# Altium PCB GR_carte_action27v2.PcbDoc
Units mil, origin at the board's own origin, x right, y up, seen from the top; angles counter-clockwise.
Board outline 3465 x 2675 mil, 2 copper layers (Top Layer, Bottom Layer); 55 components, 45 nets, 211 pads, 1 vias.
Unrouted connection lines stored in the file: 1.
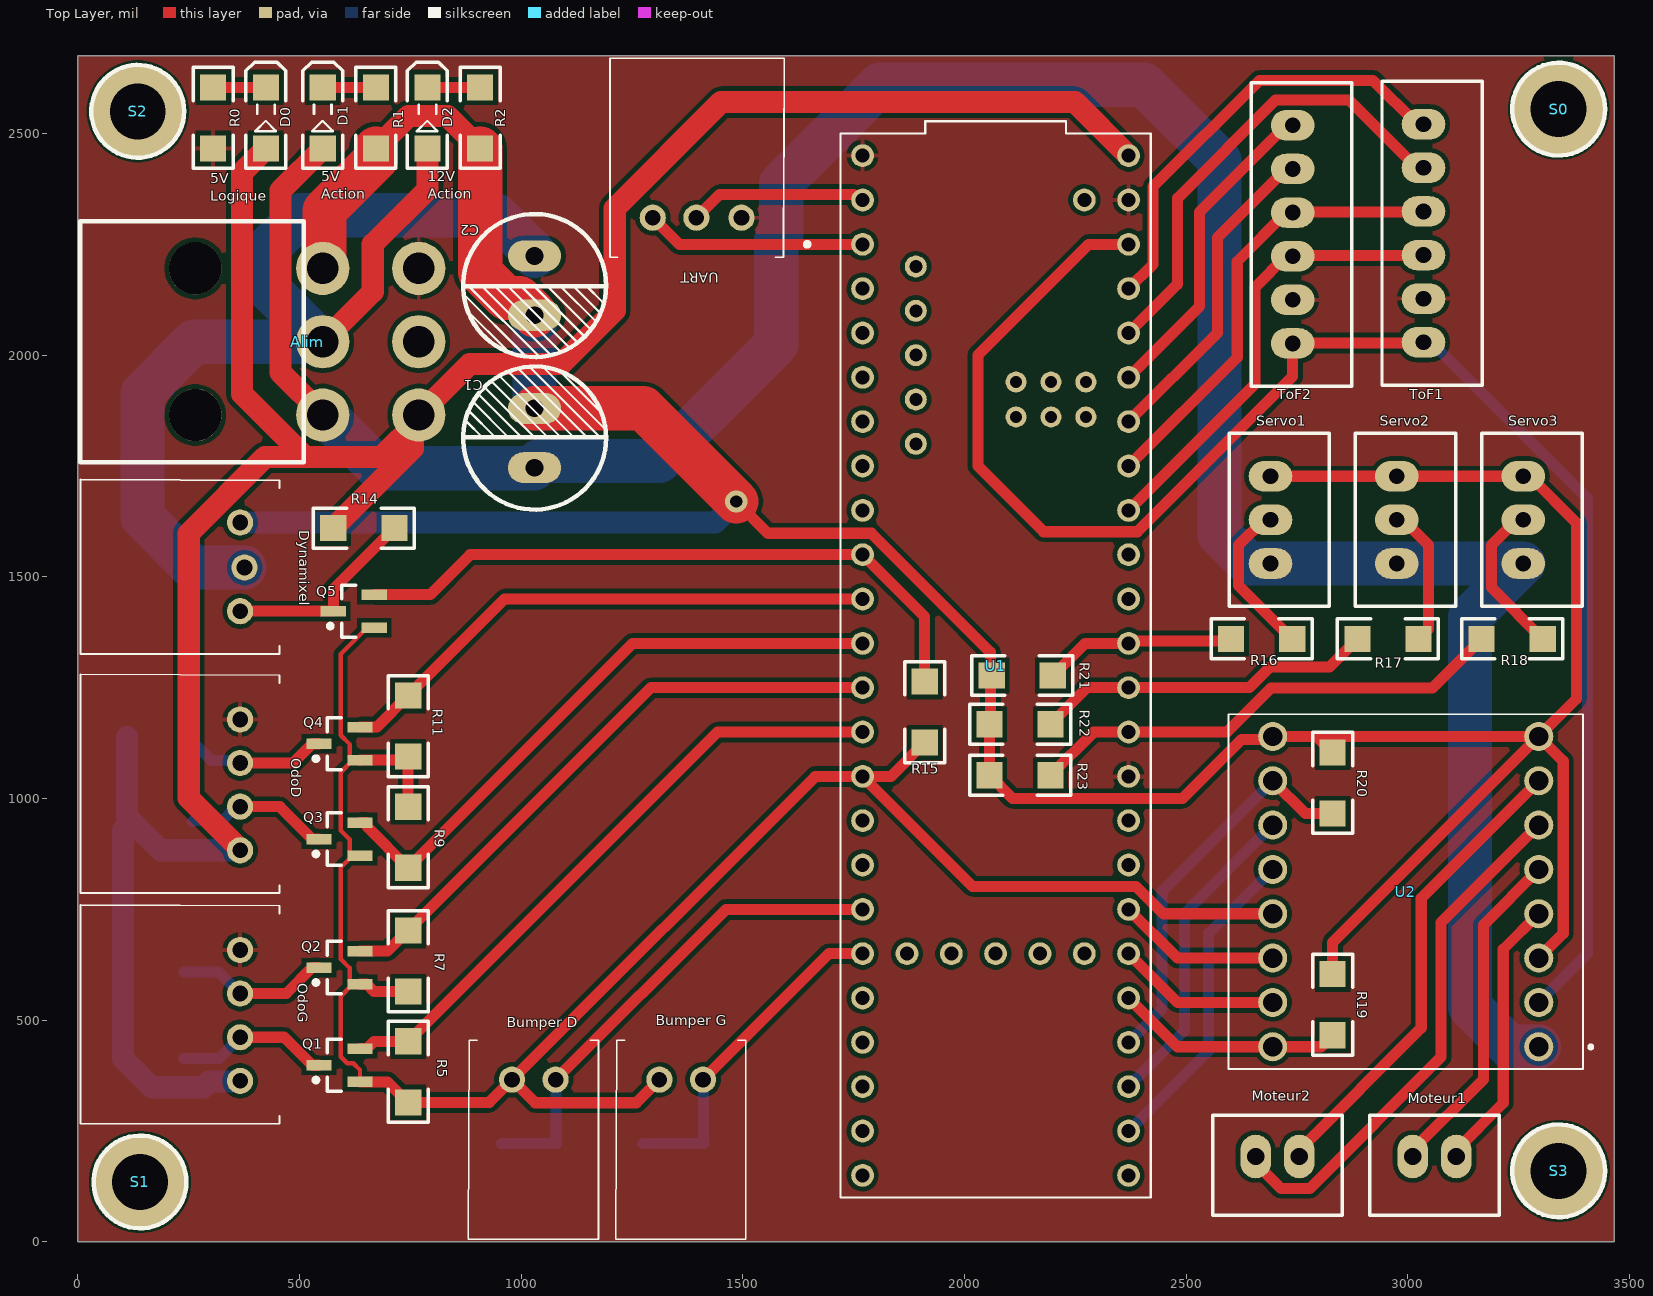
[diagram p0: Top Layer view]
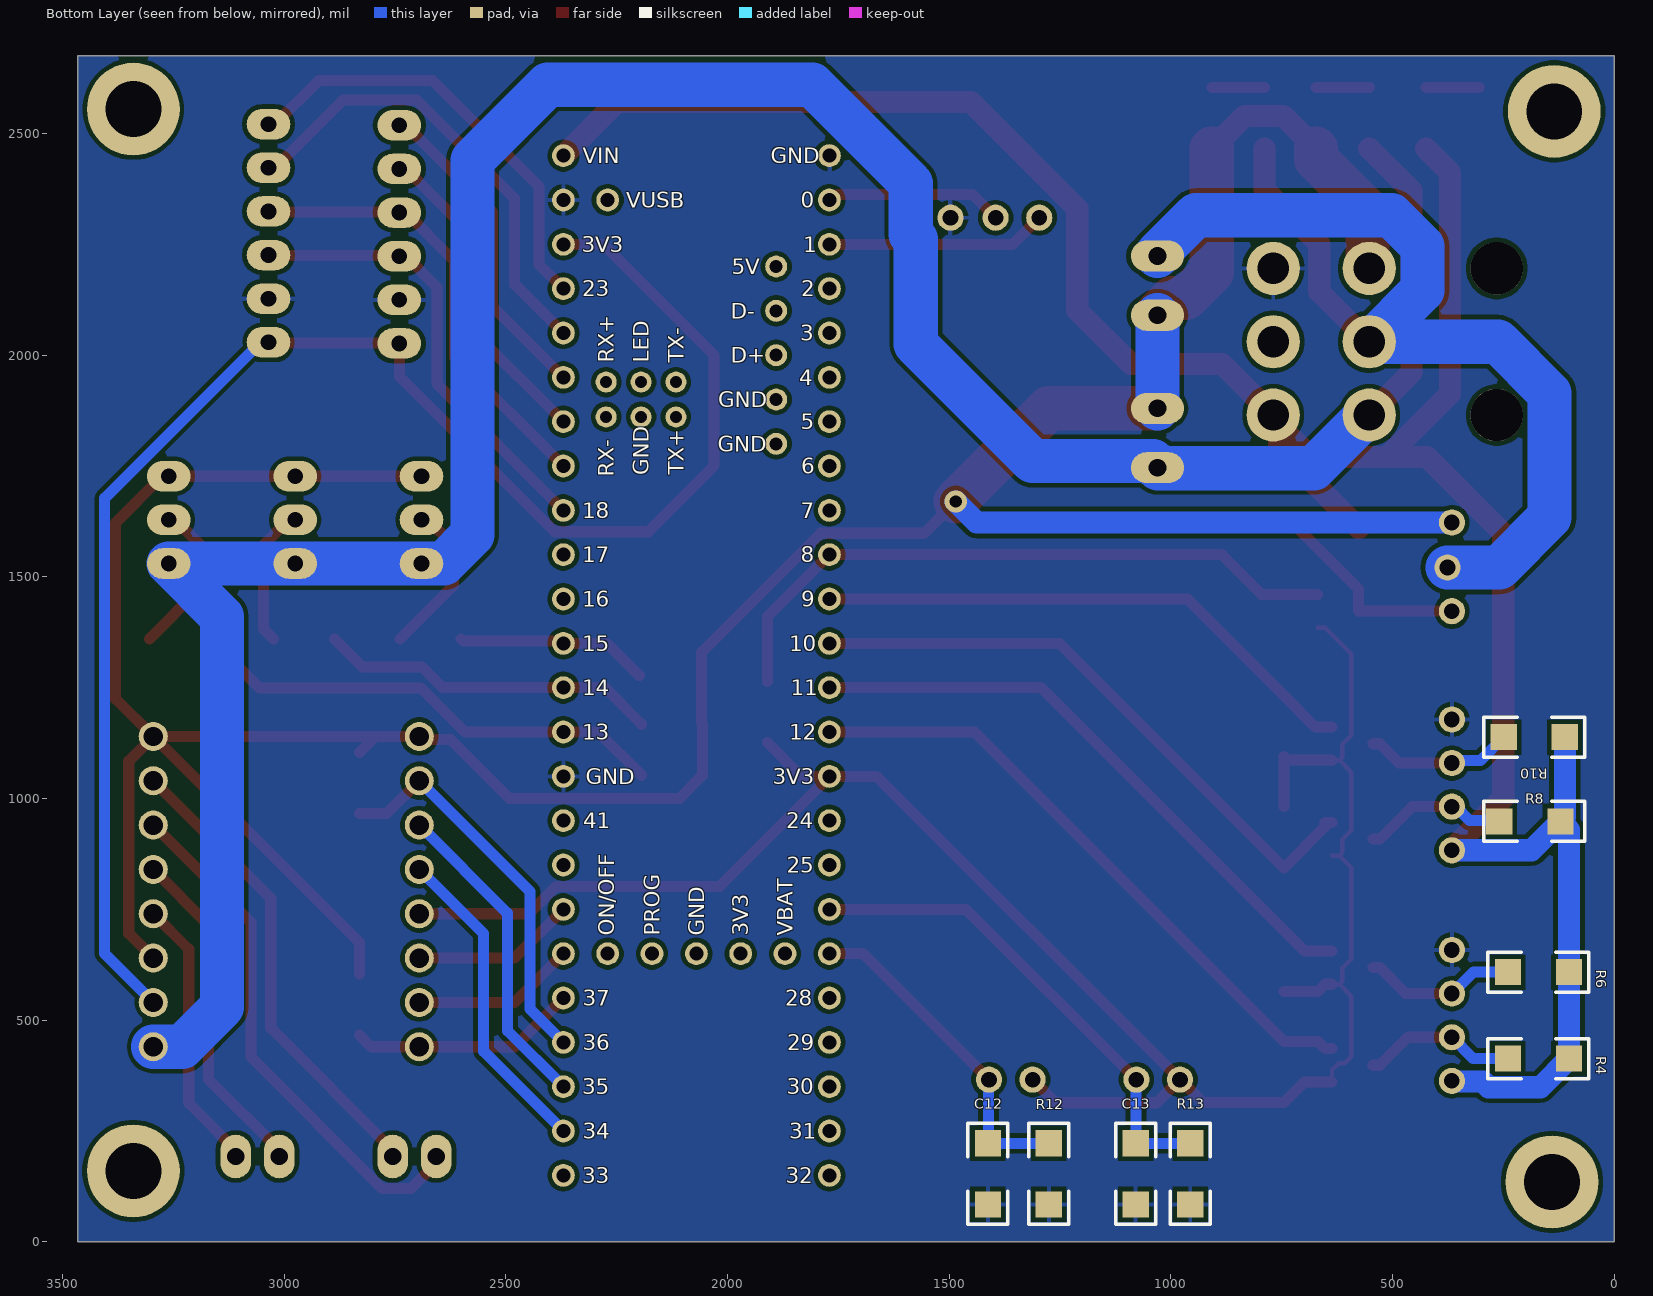
[diagram p1: Bottom Layer view, seen from below]
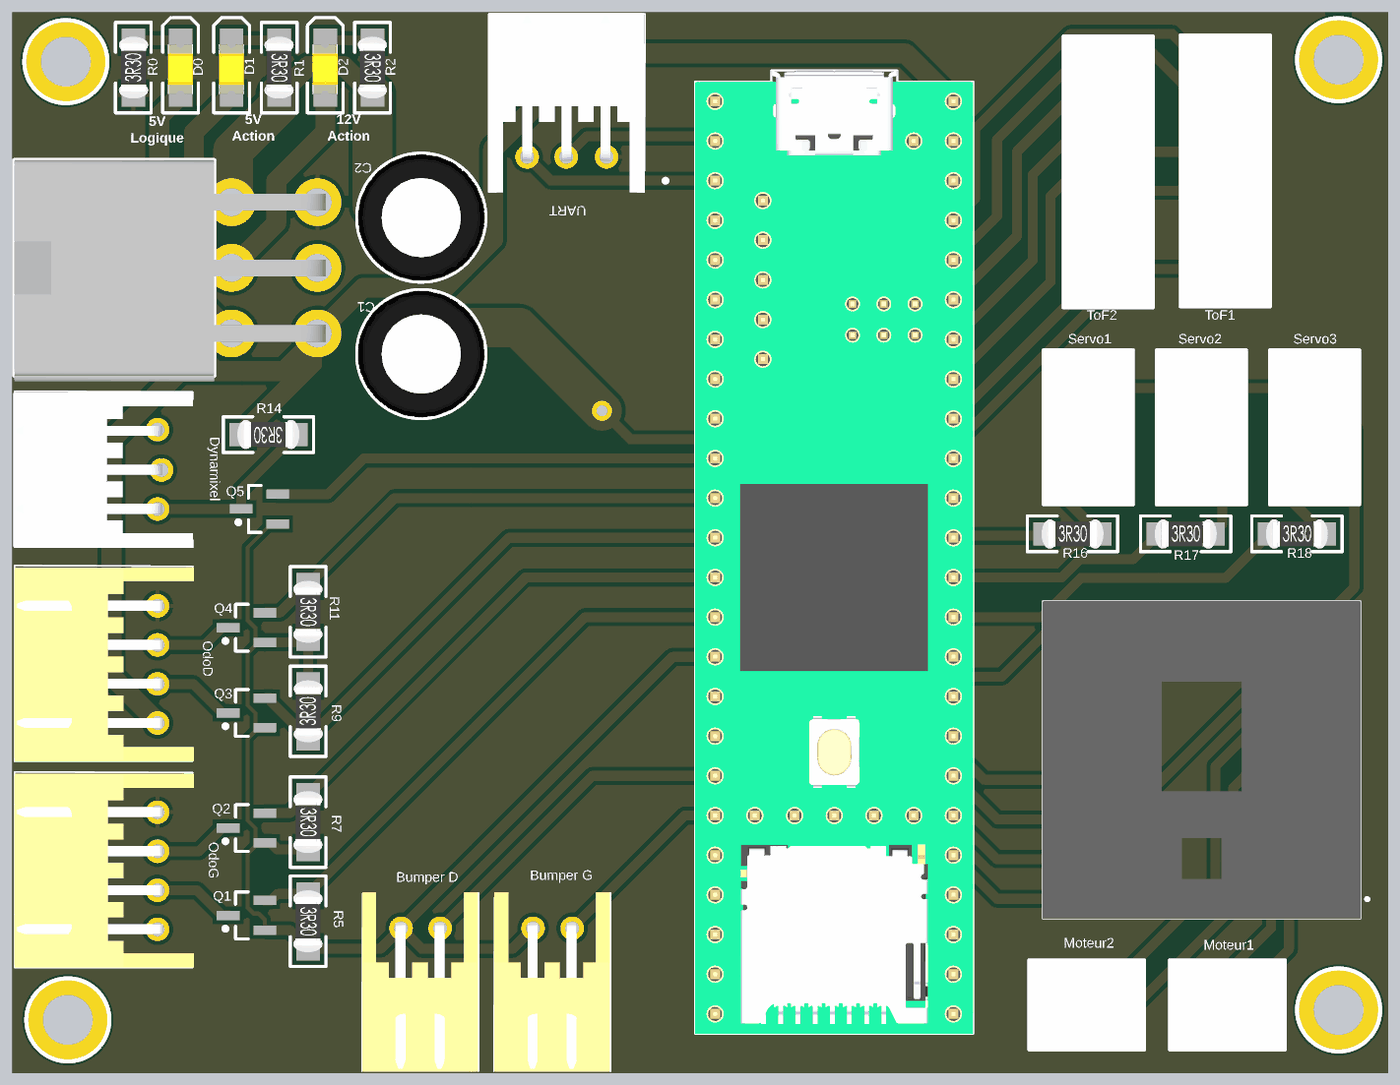
[diagram p2: 3D render of the assembled board from above, using the file's embedded part models]
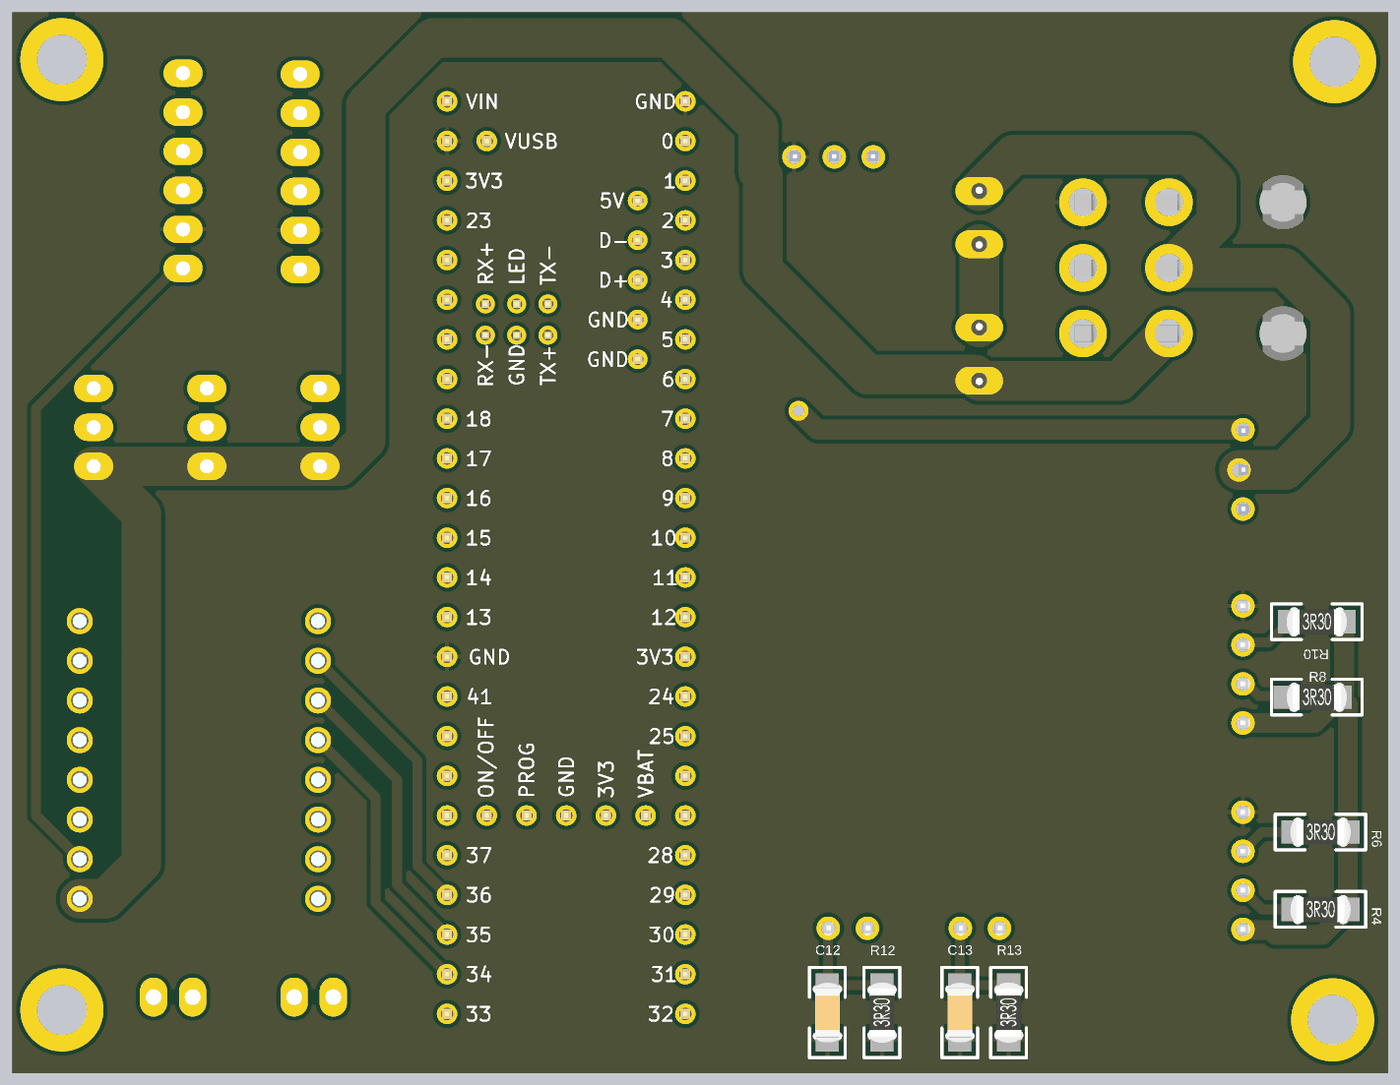
[diagram p3: 3D render of the assembled board from below, using the file's embedded part models]

## Layer stack, top to bottom
Top Solder: solder mask 0.4, Solder Resist, Dk 3.5
Top Layer: signal copper 1.4
Dielectric 1: dielectric 12.6, FR-4, Dk 4.8
Bottom Layer: signal copper 1.4
Bottom Solder: solder mask 0.4, Solder Resist, Dk 3.5

## Board outline
0,0 3465,0 3465,2675 0,2675

## Design rules (kind name [scope] priority, off if disabled: settings)
Clearance [All] p1: gap=10 ignorepadtopadclearanceinfootprint=FALSE
PolygonConnect [All] p1: connectstyle=Relief reliefconductorwidth=10 reliefentries=4 polygonreliefangle="90 Angle" airgapwidth=10
RoutingVias [All] p1: holewidth=28 width=50 viastyle="Through Hole" minholewidth=28 minwidth=50 maxholewidth=28 maxwidth=50
SolderMaskExpansion [All] p1: expansion=0 istentingtop=FALSE
SupplyNets "Schematic Supply Nets_6" [InNet('3.3V')] p1: voltage=0.000
SupplyNets "Schematic Supply Nets_5" [InNet('GND_L')] p2: voltage=0.000
SupplyNets "Schematic Supply Nets_4" [InNet('12V_A')] p3: voltage=0.000
SupplyNets "Schematic Supply Nets_2" [InNet('5V_A')] p4: voltage=0.000
SupplyNets "Schematic Supply Nets_1" [InNet('5V_L')] p5: voltage=0.000
SupplyNets "Schematic Supply Nets" [InNet('GND_A')] p6: voltage=0.000
Width [All] p1: maxlimit=100 minlimit=10 preferedwidth=25 minimp=50.000000 maximp=50.000000 favimp=50.000000
30 further rules are at their usual default settings.

## Classes and differential pairs
component class GR_carte_action_actionneurs27: Dynamixel Moteur1 Moteur2 Q5 R14 R15 R16 R17 R18 R19 R20 R21 R22 R23 Servo1 Servo2 Servo3 ToF1 ToF2 U2
component class GR_carte_action27: Alim "Bumper D" "Bumper G" C1 C2 C12 C13 D0 D1 D2 OdoD OdoG Q1 Q2 Q3 Q4 R0 R1 R2 R4 R5 R6 R7 R8 R9 R10 R11 R12 R13 S0 S1 S2 S3 U1 UART

## Components (designator, comment, footprint, x,y, rotation, side; value= is the part's Value field where it differs from the comment)
Alim "Header 3X2H" MOLEX_MINIFITJR_3X2 552.24,2030.35 r270 top
"Bumper D" "Header 2H" S2B-XH-A 1077.52,365.87 r180 top
"Bumper G" "Header 2H" S2B-XH-A 1410,365.87 r180 top
C1 "Cap2" Condensateur 1030,1746.14 r90 top value=100µF
C2 "Cap2" Condensateur 1030,2223.86 r270 top value=100µF
C12 "Cap" "Capacitor 1206" 1412.52,153.35 r90 bottom value=100nF
C13 "Cap" "Capacitor 1206" 1079.04,153.35 r90 bottom value=100nF
D0 "5V_L" KP-3216SEC 424,2535 r90 top
D1 "5V_A" KP-3216SEC 552.24,2535 r90 top
D2 "12V_A" KP-3216SEC 788.24,2535 r90 top
Dynamixel "JST XH 3" S3B-XH-A#1 365.87,1422.48 r90 top
Moteur1 "Header 2H" "JST XH B2B-XH-A" 3060,192.48 r0 top
Moteur2 "Header 2H" "JST XH B2B-XH-A" 2705.79,192.48 r0 top
OdoD "JST XH 4" S4B-XH-A 365.87,883.15 r90 top
OdoG "JST XH 4" S4B-XH-A 365.87,363.11 r90 top
Q1 "MOSFET-N" SOT23_M 590,398.43 r180 top
Q2 "MOSFET-N" SOT23_M 590,618.43 r180 top
Q3 "MOSFET-N" SOT23_M 590,908.43 r180 top
Q4 "MOSFET-N" SOT23_M 590,1123.43 r180 top
Q5 "MOSFET-N" SOT23_M 622.36,1422.48 r180 top
R0 "Res2" "Resistor 1206"#1 305,2535 r90 top value=300
R1 "Res2" "Resistor 1206"#1 672.24,2535 r270 top value=300
R2 "Res2" "Resistor 1206"#1 907.24,2535 r270 top value=1K3
R4 "Res2" "Resistor 1206"#1 170.59,413.43 r180 bottom value=4.7K
R5 "Res2" "Resistor 1206"#1 745,383.43 r270 top value=4.7K
R6 "Res2" "Resistor 1206"#1 170.59,608.43 r180 bottom value=4.7K
R7 "Res2" "Resistor 1206"#1 745,633.43 r270 top value=4.7K
R8 "Res2" "Resistor 1206"#2 180,948.43 r180 bottom value=4.7K
R9 "Res2" "Resistor 1206"#1 745,912.68 r90 top value=4.7K
R10 "Res2" "Resistor 1206"#1 180,1138.43 r180 bottom value=4.7K
R11 "Res2" "Resistor 1206"#1 745,1163.43 r270 top value=4.7K
R12 "Res2" "Resistor 1206"#1 1275,153.35 r90 bottom value=10K
R13 "Res2" "Resistor 1206"#1 956.06,153.35 r90 bottom value=10K
R14 "Res2" "Resistor 1206"#1 645,1610 r180 top value=2.2K
R15 "Res2" "Resistor 1206"#1 1910,1195 r270 top value=2.2K
R16 "Res2" "Resistor 1206"#1 2670,1360 r0 top value=330
R17 "Res2" "Resistor 1206"#1 2955,1360 r0 top value=330
R18 "Res2" "Resistor 1206"#1 3235,1360 r0 top value=330
R19 "Res2" "Resistor 1206"#1 2830,535 r90 top value=10K
R20 "Res2" "Resistor 1206"#1 2830,1035 r270 top value=10K
R21 "Res2" "Resistor 1206"#1 2130,1277.48 r0 top value=10K
R22 "Res2" "Resistor 1206"#1 2125,1167.48 r0 top value=10K
R23 "Res2" "Resistor 1206"#1 2125,1052.48 r0 top value=10K
S0 "Screw M3" "Screw M3" 3340,2555 r90 top
S1 "Screw M3" "Screw M3" 140,135 r0 top
S2 "Screw M3" "Screw M3" 135,2550 r0 top
S3 "Screw M3" "Screw M3" 3340,160 r0 top
Servo1 "Header 3" "JST XH B3B-XH-A" 2690,1628.5 r90 top
Servo2 "Header 3" "JST XH B3B-XH-A" 2975,1628.5 r90 top
Servo3 "Header 3" "JST XH B3B-XH-A" 3260,1628.5 r90 top
ToF1 "Header 6" "JST XH B6B-XH-A" 3035,2275 r90 top
ToF2 "Header 6" "JST XH B6B-XH-A" 2740,2272.48 r90 top
U1 "TEENSY_4.1" Teensy_4.1 2070,1300 r270 top value="TEENSY 4.1"
U2 "ROB-14450" ROB14450 2995,790 r90 top
UART "JST XH 3" S3B-XH-A#2 1296.57,2310 r0 top

## Footprints (in the part's own frame and the unit in brackets; to place one, negate y for a bottom-side part, rotate by r counter-clockwise, add the part's x,y. Pads: shape width x height; smd on the part's side, far side on the other; paste and mask are expansions set on the pad)
"Capacitor 1206" [mm]
  rect 1.5x1.5 smd: 1(-1.75,0) 2(1.75,0)
  silkscreen extent -2.89,-1.14 2.89,1.14, body extent -1.97,-0.99 1.97,0.96, height 1.3
Condensateur [mil]
  oval 70x120 hole 40: 1(0,0) 2(133.86,0)
  silkscreen extent -94,-161 228,161, body extent -93,-160 227,160, height 500
"JST XH B2B-XH-A" [mm]
  oval 1.75x2.5 hole 1: 1(-1.25,0) 2(1.25,0)
  silkscreen extent -3.7,-3.38 3.7,2.38, body extent -3.7,-3.38 3.7,2.38, height 7
"JST XH B3B-XH-A" [mm]
  oval 1.75x2.5 hole 0.9: 1(-2.5,0) 2(0,0) 3(2.5,0)
  silkscreen extent -4.95,-3.38 4.95,2.38, body extent -4.95,-3.37 4.95,2.38, height 7
"JST XH B6B-XH-A" [mm]
  oval 1.75x2.5 hole 0.9: 1(-6.25,0) 2(-3.75,0) 3(-1.25,0) 4(1.25,0) 5(3.75,0) 6(6.25,0)
  silkscreen extent -8.7,-3.38 8.7,2.38, body extent -8.7,-3.38 8.7,2.38, height 7
KP-3216SEC [mm]
  rect 1.5x1.5 smd: 1(-1.75,0) 2(1.75,0)
  silkscreen extent -2.89,-1.14 3.2,1.14, body extent -1.7,-0.79 1.5,0.81, height 1.1
MOLEX_MINIFITJR_3X2 [mm] "MOLEX_MINIFITJR_3X2, 39-30-1060"
  round 3.048 hole 1.8: 1(-4.2,5.5) 2(-4.2,0) 3(0,5.5) 4(0,0) 5(4.2,5.5) 6(4.2,0)
  round 3 hole 3 unplated: 10(-4.2,-7.3) 11(4.2,-7.3)
  silkscreen extent -6.9,-13.9 6.9,-1.1, body extent -6.9,-13.9 7.3,6.04, height 11.41
"Resistor 1206"#1 [mm]
  rect 1.5x1.5 smd: 1(-1.75,0) 2(1.75,0)
  silkscreen extent -2.89,-1.14 2.89,1.14, body extent -1.98,-0.95 1.98,0.93, height 0.55
"Resistor 1206"#2 [mm]
  rect 1.5x1.5 smd: 1(-2.004,0) 2(1.496,0)
  silkscreen extent -2.89,-1.14 2.89,1.14, body extent -1.98,-0.95 1.98,0.93, height 0.55
ROB14450 [mm]
  round 1.665 hole 1.11: 1(-8.89,-7.62) 2(-6.35,-7.62) 3(-3.81,-7.62) 4(-1.27,-7.62) 5(1.27,-7.62) 6(3.81,-7.62) 7(6.35,-7.62) 8(8.89,-7.62) 9(-8.89,7.62) 10(-6.35,7.62) 11(-3.81,7.62) 12(-1.27,7.62) 13(1.27,7.62) 14(3.81,7.62) 15(6.35,7.62) 16(8.89,7.62)
  silkscreen extent -10.16,-10.7 10.16,10.16, body extent -10.16,-10.16 10.16,10.16, height 5.1
S2B-XH-A [mm]
  round 1.5 hole 0.9: 1(0,0) 2(2.5,0)
  silkscreen extent -2.45,-2.26 5,9.14, body extent -2.41,-2.32 4.99,9.18, height 6.15
S3B-XH-A#1 [mm]
  round 1.5 hole 0.9: 1(0,0) 2(2.5,-0.254) 3(5.08,0)
  silkscreen extent -2.45,-2.26 7.54,9.14, body extent -2.44,-2.27 7.46,9.23, height 6.15
S3B-XH-A#2 [mm]
  round 1.5 hole 0.9: 1(0,0) 2(2.5,0) 3(5.08,0)
  silkscreen extent -2.45,-2.26 7.54,9.14, body extent -2.44,-2.27 7.46,9.23, height 6.15
S4B-XH-A [mm]
  round 1.5 hole 0.9: 1(0,0) 2(2.5,0) 3(5,0) 4(7.5,0)
  silkscreen extent -2.45,-2.26 10.08,9.14, body extent -2.44,-2.32 9.96,9.18, height 6.15
"Screw M3" [mm] "M3 iso Screw"
  round 5.32 hole 3.2 unplated: 0(0,0)
  silkscreen extent -2.66,-2.66 2.66,2.66
SOT23_M [mm] "SOT23, 3-Leads, Body 2.9x1.3mm, Pitch 0.95mm, Lead Span 2.3mm - Reverse Pinning, IPC Low Density"
  rect 1.45x0.6 smd: 1(1.175,0) 2(-1.175,-0.95) 3(-1.175,0.95)
  silkscreen extent -0.1,-1.5 1.47,1.5, body extent -0.7,-1.5 0.7,1.5, height 1.1
Teensy_4.1 [mm]
  round 1.308 hole 0.8: 0(-26.67,-7.62) 1(-24.13,-7.62) 2(-21.59,-7.62) 3(-19.05,-7.62) 3.3V_1(6.35,-7.62) 3.3V_2(-24.13,7.62) 3.3V_3(16.51,-2.54) 4(-16.51,-7.62) 5(-13.97,-7.62) 6(-11.43,-7.62) 7(-8.89,-7.62) 8(-6.35,-7.62) 9(-3.81,-7.62) 10(-1.27,-7.62) 11(1.27,-7.62) 12(3.81,-7.62) 13(3.81,7.62) 14(1.27,7.62) 15(-1.27,7.62) 16(-3.81,7.62) 17(-6.35,7.62) 18(-8.89,7.62) 19(-11.43,7.62) 20(-13.97,7.62) 21(-16.51,7.62) 22(-19.05,7.62) 23(-21.59,7.62) 24(8.89,-7.62) 25(11.43,-7.62) 26(13.97,-7.62) 27(16.51,-7.62) 28(19.05,-7.62) 29(21.59,-7.62) 30(24.13,-7.62) 31(26.67,-7.62) 32(29.21,-7.62) 33(29.21,7.62) 34(26.67,7.62) 35(24.13,7.62) 36(21.59,7.62) 37(19.05,7.62) 38(16.51,7.62) 39(13.97,7.62) 40(11.43,7.62) 41(8.89,7.62) GND1(-29.21,-7.62) GND2(6.35,7.62) GND3(-26.67,7.62) GND4(16.51,0) ON/OFF(16.51,5.08) PROGRAM(16.51,2.54) VBAT(16.51,-5.08) VIN(-29.21,7.62) VUSB(-26.67,5.08)
  round 1.258 hole 0.75: 5V(-22.86,-4.57) D+(-17.78,-4.57) D-(-20.32,-4.57) USB_GND1(-15.24,-4.57) USB_GND2(-12.7,-4.57)
  round 1.208 hole 0.7: GND5(-14.24,3.17) LED(-16.24,3.17) RX+(-16.24,5.17) RX-(-14.24,5.17) TX+(-14.24,1.17) TX-(-16.24,1.17)
  silkscreen extent -31.18,-10.92 30.48,8.89, body extent -31.18,-8.89 30.48,8.89, height 7.15

## Part data
Alim: "Header, 3-Pin, Dual row, Right Angle", LatestRevisionDate=17-Jul-2002, LatestRevisionNote="Re-released for DXP Platform.", Publisher="Altium Limited"
"Bumper D" "Bumper G" Moteur1 Moteur2: "Header, 2-Pin, Right Angle", LatestRevisionDate=17-Jul-2002, LatestRevisionNote="Re-released for DXP Platform.", Publisher="Altium Limited"
C1 C2 C12 C13: "Capacitor", Publisher="Altium Limited"
  C1 C2: PackageDescription="Capacitor; 2 Leads", PackageReference=CAPR5-4X5, Published=23-Sep-2002
  C12 C13: LatestRevisionDate=17-Jul-2002, LatestRevisionNote="Re-released for DXP Platform.", PackageDescription="Radial Cap, Thru-Hole; 2 Leads; 0.3 in Pin Spacing", PackageReference=RAD-0.3, Published=8-Jun-2000
D0 D1 D2: library part LED2, "Typical RED, GREEN, YELLOW, AMBER GaAs LED", LatestRevisionDate=17-Jul-2002, LatestRevisionNote="Re-released for DXP Platform.", PackageDescription="SM LED; 2 Flat Leads", PackageReference=3.2X1.6X1.1, PackageVersion=Feb-2002, Published=8-Jun-2000, Publisher="Altium Limited"
Dynamixel UART: library part "Header 3H", "Header, 3-Pin, Right Angle", LatestRevisionDate=17-Jul-2002, LatestRevisionNote="Re-released for DXP Platform.", Publisher="Altium Limited"
OdoD OdoG: library part "Header 4H", "Molex SPOX 4x1H", LatestRevisionDate=17-Jul-2002, LatestRevisionNote="Re-released for DXP Platform.", Publisher="Altium Limited"
Q1 Q2 Q3 Q4 Q5: "N-Channel MOSFET", LatestRevisionDate=17-Jul-2002, LatestRevisionNote="Re-released for DXP Platform.", PackageDescription="TO, Flat Index; 3 In-Line, Axial Leads; Body Dia. 4.6mm; Lead Dia. 0.5 mm (max)", PackageReference=E3, PackageVersion=1995/1996, Published=8-Jun-2000, Publisher="Altium Limited"
R0 R1 R2 R4 R5 R6 R7 R8 R9 R10 R11 R12 R13 R14 R15 R16 R17 R18 R19 R20 R21 R22 R23: "Resistor", LatestRevisionDate=17-Jul-2002, LatestRevisionNote="Re-released for DXP Platform.", PackageDescription="Axial Device, Thru-Hole; 2 Leads; 0.4 in Pin Spacing", PackageReference=AXIAL-0.4, Published=8-Jun-2000, Publisher="Altium Limited"
Servo1 Servo2 Servo3: "Header, 3-Pin", LatestRevisionDate=17-Jul-2002, LatestRevisionNote="Re-released for DXP Platform.", Publisher="Altium Limited"
ToF1 ToF2: "Header, 6-Pin", LatestRevisionDate=17-Jul-2002, LatestRevisionNote="Re-released for DXP Platform.", Publisher="Altium Limited"
U1: "RT1062 Teensy 4.1 w/ Headers RT1062 600 MHZ", Manufacturer=PJRC, Manufacturer_Part_Number=DEV-16996, ComponentLink1Description=pin_function_front, ComponentLink1URL=https://www.pjrc.com/teensy/card11a_rev4_web.pdf, ComponentLink2Description=pin_function_back, ComponentLink2URL=https://www.pjrc.com/teensy/card11b_rev4_web.pdf, ComponentLink3Description=Digikey, ComponentLink3URL=https://www.digikey.com/en/products/detail/sparkfun-electronics/16996/13158152, ComponentLink4Description=Datasheet, ComponentLink4URL=https://mm.digikey.com/Volume0/opasdata/d220001/medias/docus/2942/DEV-16996_Web.pdf
U2: "Undefined or Miscellaneous", Manufacturer_Name=SparkFun, Mouser Part Number=474-ROB-14450, Arrow Part Number=ROB-14450, Arrow Price/Stock=https://www.arrow.com/en/products/rob-14450/sparkfun-electronics?region=nac, Datasheet Link=https://www.sparkfun.com/products/14450, Height=5mm, Manufacturer_Part_Number=ROB-14450, Mouser Price/Stock=https://www.mouser.co.uk/ProductDetail/SparkFun/ROB-14450?qs=wd5RIQLrsJhQdlH%2FW5H2aQ%3D%3D

## Via types
v1: diameter 50, hole 28, Top Layer to Bottom Layer, 1 vias

## Nets (pads, with @x,y where several pads share a name; then routed paths per layer and width w, separated by ;. In a path a pad name is that pad's centre, name@x,y a point inside that pad or via, vN(x,y) a via of type N, cw(c..) or ccw(c..) an arc to the next point about the centre after c; other vN are vias at no path point)
3.3V: "Bumper D.2" "Bumper G.2" Q1.3 Q2.3 Q3.3 Q4.3 Q5.3 R5.2 R7.2 R9.2 R11.2 R15.2 ToF1.1 ToF2.1 U1.3.3V_1 U1.3.3V_2 U2.2 U2.12 | length 8304.5
  Top Layer w10: Q1.3 636.26,387.83 621.28,402.82 607.7,402.82 592.72,417.8 592.72,554.21 Q2.3@619.53,581.02 ; Q2.3 Q2.3@619.53,581.02 ; Q3.3 Q3.3@619.53,871.02 ; Q4.3 Q4.3@619.53,1086.02 ; Q5.3 651.89,1385.08 592.72,1325.91 592.72,1142.8 612.72,1122.8 612.72,1092.83 Q4.3@619.53,1086.02 ; Q2.3@619.53,581.02 612.72,587.83 612.72,617.8 592.72,637.8 592.72,844.21 Q3.3@619.53,871.02 ; Q3.3@619.53,871.02 612.72,877.83 612.72,907.8 592.72,927.8 592.72,1059.21 Q4.3@619.53,1086.02
  Top Layer w25: Q1.3 698.5,361.02 R5.2 927.76,314.53 979.09,365.87 ; Q2.3 651.61,581.02 668.11,564.53 R7.2 ; Q4.3 636.95,1086.71 737.18,1086.71 R11.2 R9.2 ; 1311.57,365.87 1259.55,313.84 1031.12,313.84 979.09,365.87 ; R15.2 1833.9,1050 U1.3.3V_1 ; U1.3.3V_2 2280,2250 2030,2000 2030,1750 2178.25,1601.75 2389.99,1601.75 2740,1951.77 ToF2.1 2741.26,2027.68 3033.74,2027.68 ToF1.1 ToF1.1@3053.29,2028.94 ; U2.12 2448.23,740 2386.48,801.75 2018.25,801.75 U1.3.3V_1 ; 979.09,365.87 1663.23,1050 U1.3.3V_1
  Bottom Layer w25: ToF1.1 3053.29,2028.94 3405,1677.23 3405,650 U2.2
5V_A: Alim.6 C1.1 D1.1 Servo1.1 Servo2.1 Servo3.1 U2.1 | length 6188.8
  Top Layer w50: Alim.6 552.24,1865.92 457.24,1960.92 457.24,2371.1 D1.1
  Bottom Layer w100: Alim.6 557.66,1865 677.66,1745 1028.86,1745 C1.1 1030,1751.14 1040,1761.14 1311.14,1761.14 1575,2025 1575,2261.81 1586.1,2272.92 1586.1,2387.37 1808.73,2610 2405,2610 2575,2440 2575,1595.17 2640.09,1530.08 Servo1.1 Servo2.1 Servo3.1 3140,1410.08 3140,529.56 3229.56,440 U2.1
5V_L: Alim.5 D0.1 OdoD.1 OdoG.1 R4.2 R6.2 R8.2 R10.2 R14.2 U1.VIN | length 5876.3
  Top Layer w50: OdoD.1 365.87,885.6 250,1001.47 250,1597.87 422.13,1770 512.89,1770 ; D0.1 370,2412.1 370,1912.89 512.89,1770 ; R14.2 755.39,1789.28 Alim.5@755.39,1851.61 ; U1.VIN 2249.25,2570.75 1450.75,2570.75 1210.75,2330.75 1210.75,2100.75 1090,1980 883.78,1980 Alim.5 768.78,1853.78 685,1770 512.89,1770
  Bottom Layer w50: R10.2 111.1,958.43 R8.2 ; OdoG.1 364.13,361.38 295.99,361.38 283.51,348.9 166.22,348.9 R4.2 R6.2 101.69,929.02 R8.2 ; OdoD.1 186.38,883.15 R8.2
12V_A: Alim.4 C2.1 D2.1 Dynamixel.2 | length 2480.3
  Top Layer w50: Alim.4 665,2143.11 665,2250 788.24,2373.24 D2.1
  Bottom Layer w100: Dynamixel.2 259.09,1520.91 145.79,1634.21 145.79,1914.31 261.83,2030.35 Alim.4 547.89,2030.35 432.24,2146 432.24,2245.41 502.54,2315.71 943.15,2315.71 1030,2228.86 C2.1
AX12_data: Dynamixel.1 Q5.1 R14.1 | length 454.8
  Top Layer w25: Dynamixel.1 Q5.1 576.1,1472.2 R14.1
GND_A: Alim.2 C1.2 C2.2 Dynamixel.3 R1.2 R2.2 R19.2 R20.1 R21.1 R22.1 R23.1 Servo1.3 Servo2.3 Servo3.3 U2.3 U2.8 U2.16 | length 7838.8
  Top Layer w25: v1(1485,1670) 1556.75,1598.25 1789.98,1598.25 2058.37,1329.86 2058.37,1280.21 2058.6,1279.98 2058.6,1169.98 R22.1 R23.1 2108.49,1000.1 2491.42,1000.1 2624.72,1133.4 2688.4,1133.4 U2.16 U2.8 ; Servo1.3 Servo2.3 Servo3.3 3274.76,1726.93 3380,1621.69 3380,1225 U2.8 ; 2793.9,1140 R20.1 ; R19.2 2830,675 U2.8 ; U2.3 3350.28,695.28 3350.28,1084.72 U2.8
  Top Layer w50: R1.2 745.51,2539.37 833.98,2539.37 R2.2
  Top Layer w100: Alim.2 556.07,2199.54 556.07,2326.02 672.24,2442.19 R1.2 ; R2.2 907.24,2187.26 965.65,2128.86 996.14,2128.86 1030,2095 C2.2 ; C1.2 1275,1880 v1(1485,1670)
  Bottom Layer w50: Dynamixel.3 1437.48,1622.48 v1(1485,1670)
  Bottom Layer w100: C1.2 C2.2
GND_L: Alim.1 C12.1 C13.1 OdoD.4 OdoG.4 R0.1 R12.1 R13.1 ToF1.2 ToF2.2 U1.GND1 U1.GND2 U1.GND3 UART.3
M1+: Moteur1.2 U2.4 | length 624.5
  Top Layer w25: Moteur1.2 3109.21,207.24 3215,313.03 3215,660 U2.4
M1-: Moteur1.1 U2.5 | length 765.2
  Top Layer w25: Moteur1.1 3010.79,207.24 3170,366.46 3170,715 U2.5
M2+: Moteur2.2 U2.7 | length 1071.2
  Top Layer w25: Moteur2.2 2755,207.24 3030,482.24 3030,775 U2.7
M2-: Moteur2.1 U2.6 | length 1193.5
  Top Layer w25: Moteur2.1 2656.57,177.72 2713.52,120.77 2778.59,120.77 3075,417.18 3075,720 U2.6
NetD0_2: D0.2 R0.2 | length 119
  Top Layer w25: R0.2 D0.2
NetD1_2: D1.2 R1.1 | length 120
  Top Layer w25: D1.2 R1.1
NetD2_2: D2.2 R2.1 | length 119
  Top Layer w25: D2.2 R2.1
NetR16_2: R16.2 Servo1.2 | length 356.8
  Top Layer w25: Servo1.2 2675.24,1628.5 2618.29,1571.56 2618.29,1480.61 R16.2
NetR17_2: R17.2 Servo2.2 | length 316.3
  Top Layer w25: Servo2.2 2989.76,1628.5 3046.71,1571.56 3046.71,1382.82 R17.2
NetR18_2: R18.2 Servo3.2 | length 354.7
  Top Layer w25: Servo3.2 3245.24,1628.5 3188.29,1571.56 3188.29,1475.61 R18.2
OdoD_A: OdoD.2 Q3.1 R8.1 | length 328.9
  Top Layer w25: OdoD.2 455.24,981.57 528.39,908.43 Q3.1
  Bottom Layer w25: R8.1 261.32,950.85 325.93,950.85 356.65,981.57 OdoD.2
OdoD_B: OdoD.3 Q4.1 R10.1 | length 337
  Top Layer w25: OdoD.3 484.96,1080 528.39,1123.43 Q4.1
  Bottom Layer w25: R10.1 301.28,1086.04 359.82,1086.04 OdoD.3
OdoG_A: OdoG.2 Q1.1 R4.1 | length 350.3
  Top Layer w25: OdoG.2 465.28,461.54 528.39,398.43 Q1.1
  Bottom Layer w25: R4.1 317.76,413.43 OdoG.2
OdoG_B: OdoG.3 Q2.1 R6.1 | length 348.5
  Top Layer w25: OdoG.3 469.92,559.96 528.39,618.43 Q2.1
  Bottom Layer w25: R6.1 317.4,608.43 OdoG.3
ODrive_RX1: U1.1 UART.1 | length 498.3
  Top Layer w25: UART.1 1356.57,2250 U1.1
ODrive_TX1: U1.0 UART.2 | length 401.5
  Top Layer w25: UART.2 1447.03,2362.03 1750.8,2362.03 1762.83,2350 U1.0
PWM_MD: R19.1 U1.37 U2.9 | length 516.4
  Top Layer w25: U1.37 2480,440 U2.9 2803.9,440 R19.1
PWM_MG: R20.2 U1.36 U2.15 | length 890.2
  Top Layer w25: U2.15 2768.9,966.1 R20.2
  Bottom Layer w25: U1.36 2445,525 2445,790 U2.15
"Sens1 MD": U1.39 U2.11 | length 370.6
  Top Layer w25: U1.39 2480,640 U2.11
"Sens1 MG": U1.34 U2.13 | length 724.6
  Bottom Layer w25: U1.34 2550,430 2550,695 U2.13
"Sens2 MD": U1.38 U2.10 | length 370.6
  Top Layer w25: U1.38 2480,540 U2.10
"Sens2 MG": U1.35 U2.14 | length 724.6
  Bottom Layer w25: U1.35 2496.16,476.16 2496.16,741.16 U2.14
T_AX12_data: Q5.2 R15.1 U1.8 | length 1482.8
  Top Layer w25: Q5.2 794.88,1459.88 885,1550 U1.8 1910,1410 R15.1
T_Bump_ArD: "Bumper D.1" C13.2 R13.2 U1.26 | length 1118.8
  Top Layer w25: 1077.52,365.87 1461.65,750 U1.26
  Bottom Layer w25: R13.2 C13.2 1078.28,223 1078.28,365.1 1077.52,365.87
T_Bump_ArG: "Bumper G.1" C12.2 R12.2 U1.27 | length 759.9
  Top Layer w25: 1410,365.87 1694.13,650 U1.27
  Bottom Layer w25: R12.2 C12.2 1411.26,223.5 1411.26,364.61 1410,365.87
T_GPIO1: ToF1.6 U1.23 | length 1003.2
  Top Layer w25: U1.23 2425,2205 2425,2380 2665,2620 2921.3,2620 3020.24,2521.06 ToF1.6
T_GPIO2: ToF2.6 U1.21 | length 730.5
  Top Layer w25: U1.21 2530,2110 2530,2323.31 2725.24,2518.54 ToF2.6
T_I2C_SCL: ToF1.4 ToF2.4 U1.19 | length 1029.6
  Top Layer w25: U1.19 2615,1995 2615,2211.46 2725.24,2321.69 ToF2.4 2741.26,2322.95 3033.74,2322.95 ToF1.4
T_I2C_SDA: ToF1.3 ToF2.3 U1.18 | length 1031.2
  Top Layer w25: U1.18 2655,1935 2655,2153.03 2725.24,2223.27 ToF2.3 2741.26,2224.53 3033.74,2224.53 ToF1.3
T_odoD_A: Q3.2 R9.1 U1.10 | length 1390.8
  Top Layer w25: Q3.2 651.61,945.83 652.3,945.14 652.3,936.48 R9.1 1251.22,1350 U1.10
T_odoD_B: Q4.2 R11.1 U1.9 | length 1253.5
  Top Layer w25: Q4.2 636.95,1161.52 674.19,1161.52 R11.1 962.68,1450 U1.9
T_odoG_A: Q1.2 R5.1 U1.12 | length 1429.6
  Top Layer w25: Q1.2 651.61,435.83 668.11,452.32 R5.1 1442.68,1150 U1.12
T_odoG_B: Q2.2 R7.1 U1.11 | length 1379.9
  Top Layer w25: Q2.2 698.5,655.83 R7.1 1292.68,1250 U1.11
T_servo1: R16.1 R21.2 U1.15 | length 436.4
  Top Layer w25: R21.2 2271.42,1350 U1.15 2375,1355 2596.1,1355 R16.1
T_servo2: R17.1 R22.2 U1.14 | length 771.9
  Top Layer w25: R22.2 2276.42,1250 U1.14 2642.33,1250 2688.82,1296.49 2822.59,1296.49 R17.1
T_servo3: R18.1 R23.2 U1.13 | length 1099.6
  Top Layer w25: R23.2 2291.42,1150 U1.13 2591.83,1150 2690.85,1249.02 3055.12,1249.02 R18.1
T_XSHUT1: ToF1.5 U1.22 | length 1059.5
  Top Layer w25: U1.22 2412.5,2092.5 2480,2160 2480,2353.84 2701.65,2575.49 2867.38,2575.49 3020.24,2422.64 ToF1.5
T_XSHUT2: ToF2.5 U1.20 | length 732
  Top Layer w25: U1.20 2570,2050 2570,2264.88 2725.24,2420.12 ToF2.5
pads on no net: Alim.3 Alim.10 Alim.11 S0.0 S1.0 S2.0 S3.0 U1.2 U1.3 U1.3.3V_3 U1.4 U1.5 U1.5V U1.6 U1.7 U1.16 U1.17 U1.24 U1.25 U1.28 U1.29 U1.30 U1.31 U1.32 U1.33 U1.40 U1.41 U1.D+ U1.D- U1.GND4 U1.GND5 U1.LED U1.ON/OFF U1.PROGRAM U1.RX+ U1.RX- U1.TX+ U1.TX- U1.USB_GND1 U1.USB_GND2 U1.VBAT U1.VUSB

## Polygon pours and split planes (outlines as drawn)
GND_L on Top Layer "GND_L_L01_P000" (solid, remove dead copper, pour order 0): 0,0 3465,0 3465,2675 0,2675
GND_L on Bottom Layer "GND_L_L02_P001" (solid, remove dead copper, pour order 1): 0,0 3465,0 3465,2675 0,2675

## Silkscreen, mask and mechanical layers (free items; w line width, h text height)
Top Overlay:
  text "5V / Action" at 549.39,2345 h39.37
  text "12V / Action" at 789.39,2345 h39.37
  text "5V / Logique" at 298.58,2340 h39.37

## Text inside footprints (layer, text, board x,y; h text height)
U1: Bottom Overlay "VIN" at 2326,2432.5 h35; Bottom Overlay "3V3" at 2328,2232.5 h35; Bottom Overlay "23" at 2327,2132.5 h35; Bottom Overlay "GND" at 2320,1032.5 h35; Bottom Overlay "14" at 2327,1232.5 h35; Bottom Overlay "41" at 2325,932.5 h35; Bottom Overlay "17" at 2326.99,1532.5 h35; Bottom Overlay "18" at 2326.99,1632.5 h35; Bottom Overlay "13" at 2327,1132.5 h35; Bottom Overlay "16" at 2327,1432.5 h35; Bottom Overlay "15" at 2326.99,1332.5 h35; Bottom Overlay "33" at 2327,132.51 h35; Bottom Overlay "34" at 2326,232.51 h35; Bottom Overlay "35" at 2327,332.5 h35; Bottom Overlay "36" at 2326,432.5 h35; Bottom Overlay "37" at 2326,532.5 h35; Bottom Overlay "28" at 1869,532.5 h35; Bottom Overlay "1" at 1829,2232.49 h35; Bottom Overlay "24" at 1867,932.5 h35; Bottom Overlay "25" at 1866,832.5 h35; Bottom Overlay "12" at 1861,1132.5 h35; Bottom Overlay "3V3" at 1898,1032.5 h35; Bottom Overlay "11" at 1857,1232.5 h35; Bottom Overlay "10" at 1861,1332.49 h35; Bottom Overlay "5" at 1835,1832.49 h35; Bottom Overlay "4" at 1838.28,1932.49 h35; Bottom Overlay "3" at 1836,2032.49 h35; Bottom Overlay "9" at 1834,1432.49 h35; Bottom Overlay "7" at 1835,1632.49 h35; Bottom Overlay "8" at 1835,1532.49 h35; Bottom Overlay "6" at 1833,1732.49 h35; Bottom Overlay "2" at 1834,2132.49 h35; Bottom Overlay "0" at 1835,2332.49 h35; Bottom Overlay "VUSB" at 2228,2332.5 h35; Bottom Overlay "TX-" at 2098.57,1983 h35 r270; Bottom Overlay "LED" at 2177.31,1983 h35 r270; Bottom Overlay "RX+" at 2256.05,1983 h35 r270; Bottom Overlay "ON/OFF" at 2255,690 h35 r270; Bottom Overlay "PROG" at 2152.5,690 h35 r270; Bottom Overlay "GND" at 2052.5,691 h35 r270; Bottom Overlay "3V3" at 1952.5,690 h35 r270; Bottom Overlay "GND" at 2022,1782.49 h35; Bottom Overlay "GND" at 2021,1882.49 h35; Bottom Overlay "D+" at 1993,1982.49 h35; Bottom Overlay "D-" at 1993,2082.49 h35; Bottom Overlay "5V" at 1990,2182.49 h35; Bottom Overlay "VBAT" at 1852.5,691 h35 r270; Bottom Overlay "29" at 1865,432.5 h35; Bottom Overlay "30" at 1866,332.5 h35; Bottom Overlay "31" at 1860,232.5 h35; Bottom Overlay "32" at 1868,132.5 h35; Bottom Overlay "GND" at 1902,2432.49 h35; Bottom Overlay "GND" at 2177.31,1729 h35 r270; Bottom Overlay "RX-" at 2256.05,1726 h35 r270; Bottom Overlay "TX+" at 2098.57,1730 h35 r270; Top 3D Body "Teensy 4.1" at 2083.39,1309.84 h50 r270